# Altium PCB LTE GNSS Tracker.PcbDoc (part 2 of 5)
Units mil, origin at the board's own origin, x right, y up, seen from the top; angles counter-clockwise.
Board outline 2165.35 x 4361.93 mil, 4 copper layers (Top Layer, Layer 1, Layer 2, Bottom Layer), stack 38.189 mil thick; 158 components, 113 nets, 617 pads, 1197 vias.
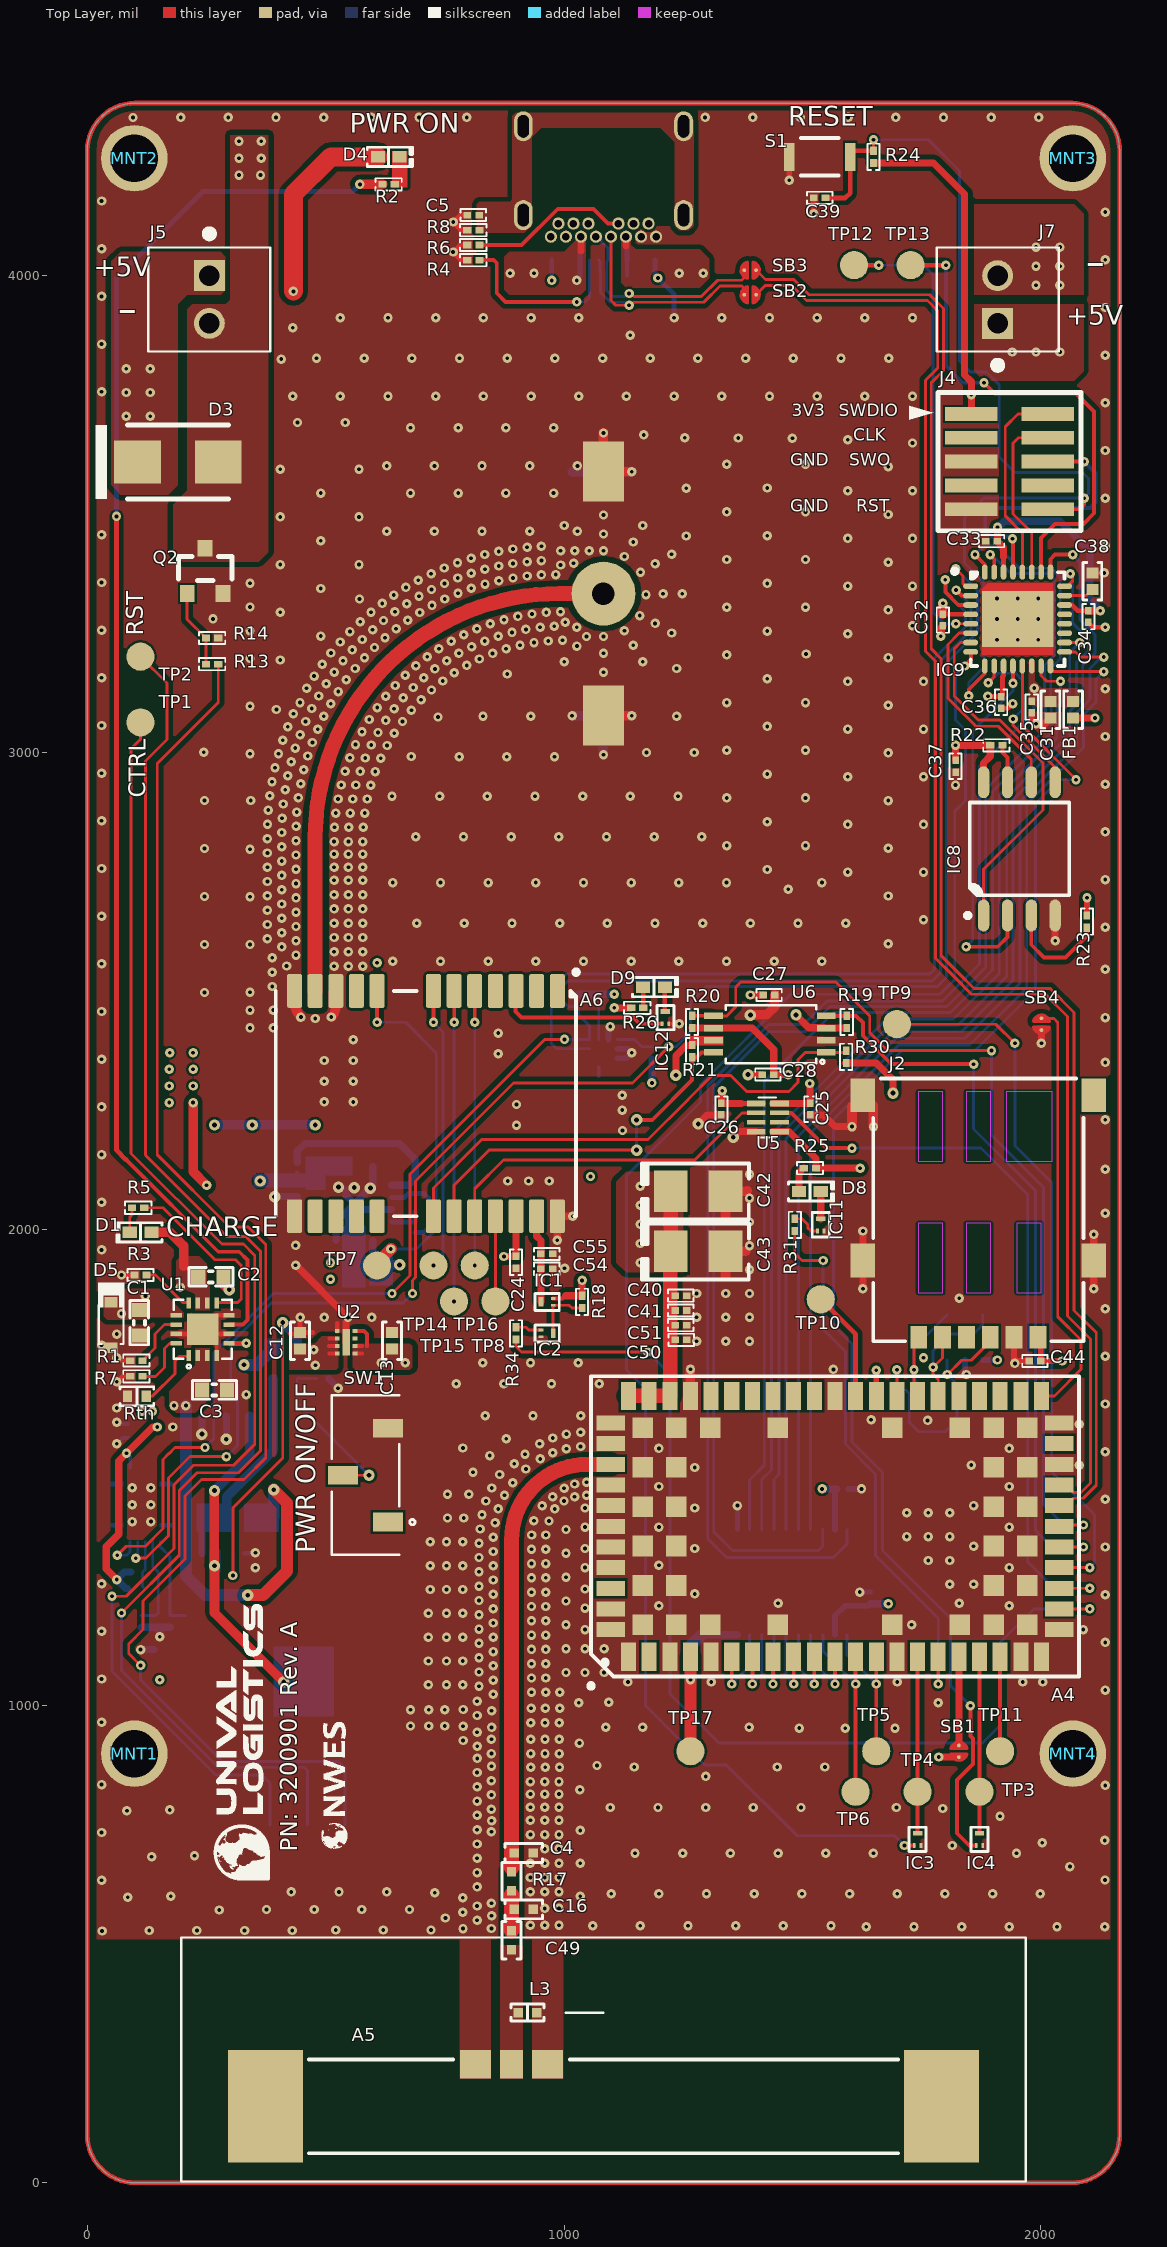
[diagram p0: Top Layer view]

## Part data (continued)
C50: library part Capacitor, "CAP CER 15PF 25V C0G 0201", Device Package="0201 (0603 Metric)", Manufacturer="TDK Corporation", Operating Temperature="-55°C ~ 125°C", Part Number=CGA1A2C0G1E150J030BA, Ratings=AEC-Q200, Supplier Part Number 1=445-9034-1-ND, Temperature Coefficient="C0G, NP0", Tolerance=±5%, Voltage - Rated=25V, Applications=Automotive, Capacitance=15pF, ComponentLink1Description=Datasheet, ComponentLink1URL=https://product.tdk.com/info/en/catalog/datasheets/mlcc_automotive_general_en.pdf?ref_disty=digikey, ComponentLink2Description="DigiKey Link", ComponentLink2URL=http://digikey.com/product-detail/en/tdk-corporation/CGA1A2C0G1E150J030BA/445-9034-1-ND/3648614, LastUpdated="21/01/2020 00:00:11", Lifecycle Status=Active, Minimum Order=1, Mounting Type="Surface Mount, MLCC", Package / Case="0201 (0603 Metric)", Packaging=TapeAndReel, Part Status=Active, PartId=1675, Price=0.01, Series=CGA, Size / Dimension="0.024\" L x 0.012\" W (0.60mm x 0.30mm)", Supplier 1=DigiKey, Thickness (Max)="0.013\" (0.33mm)"
D1 D9: library part LED, "LED RED CLEAR 0402 SMD", Current - Test=20mA, Device Package="0402 (1005 Metric)", Lens Color=Clear, Manufacturer=Inolux, Millicandela Rating=90mcd, Part Number=IN-S42ATR, Supplier Device Package=0402, Supplier Part Number 1=1830-1057-1-ND, Voltage - Forward (Vf) (Typ)=2.1V, Color=Red, ComponentLink1Description=Datasheet, ComponentLink1URL=http://www.inolux-corp.com/datasheet/SMDLED/Mono%20Color%20Top%20View/IN-S42AT%20Series_V1.1.pdf, ComponentLink2Description="DigiKey Link", ComponentLink2URL=http://digikey.com/product-detail/en/inolux/IN-S42ATR/1830-1057-1-ND/7604692, Configuration=Standard, Height (Max)=0.55mm, LastUpdated="21/01/2020 03:12:45", Lens Size="0.60mm x 0.45mm", Lens Style="Rectangle with Flat Top", Lens Transparency=Clear, Lifecycle Status=Active, Minimum Order=1, Mounting Type="Surface Mount", Package / Case="0402 (1005 Metric)", Packaging=TapeAndReel, Part Status=Active, PartId=504, Price=0.06, Series=IN-S42AT, Size / Dimension="1.00mm L x 0.50mm W", Supplier 1=DigiKey, Viewing Angle=130°, Wavelength - Dominant=631nm, Wavelength - Peak=645nm
D2: "Diode Small Signal Schottky 30V 0.2A Automotive 4-Pin UMD T/R", Average Rectified Current=200mA, Case/Package=SOT-343, Forward Voltage=500mV, Manufacturer=Rohm, Max Forward Surge Current (Ifsm)=1A, Max Operating Temperature=125°C, Max Repetitive Reverse Voltage (Vrrm)=30V, Max Reverse Current=30uA, Package Quantity=1, Supplier Part Number 1=846-RB481KTLCT-ND, Category="Schottky Diodes", ComponentLink1Description=https://datasheet.ciiva.com/906/rb481k-906368.pdf?src-supplier=Digi-Key, ComponentLink1URL=https://datasheet.ciiva.com/906/rb481k-906368.pdf?src-supplier=Digi-Key, ComponentLink2Description=https://datasheet.ciiva.com/5739/24652-5739061.pdf?src-supplier=Farnell, ComponentLink2URL=https://datasheet.ciiva.com/5739/24652-5739061.pdf?src-supplier=Farnell, ComponentLink3Description=https://datasheet.ciiva.com/25968/rb481k-25968757.pdf?src-supplier=Avnet+Europe, ComponentLink3URL=https://datasheet.ciiva.com/25968/rb481k-25968757.pdf?src-supplier=Avnet+Europe, ComponentLink4Description=https://datasheet.ciiva.com/13083/rb481k-210787-13083722.pdf?src-supplier=Mouser, ComponentLink4URL=https://datasheet.ciiva.com/13083/rb481k-210787-13083722.pdf?src-supplier=Mouser, ComponentLink5Description=https://datasheet.ciiva.com/26325/140681-da-01-en-schottky-diode-rb481ktl-sot-343-26325256.pdf?src-supplier=Conrad, ComponentLink5URL=https://datasheet.ciiva.com/26325/140681-da-01-en-schottky-diode-rb481ktl-sot-343-26325256.pdf?src-supplier=Conrad, ComponentLink6Description=https://datasheet.ciiva.com/16481/rb481k-16481067.pdf?src-supplier=Future+Electronics, ComponentLink6URL=https://datasheet.ciiva.com/16481/rb481k-16481067.pdf?src-supplier=Future+Electronics, Current Rating=200mA, Forward Current=200mA, Height=0.9mm, Lead Free="Lead Free", Length=2mm, Manufacturer Part Number=RB481KTL, Max Reverse Leakage Current=30uA, Max Reverse Voltage (DC)=30V, Max Surge Current=1A, Mount="Surface Mount", Number of Pins=4, Packaging="Tape and Reel", Peak Non-Repetitive Surge Current=1A, Pricing 1="1=0.51000, 10=0.43300, 100=0.32340 (USD)", Radiation Hardening=No, REACH SVHC="No SVHC", RoHS=Yes, RoHS Compliant=Yes, Series=-, Stock 1=154, Supplier 1=Digi-Key, Termination=SMD/SMT, Voltage Rating (DC)=30V, Width=1.25mm
D3: library part 1N5819HW1-7-F, "DIODE GEN PURP 50V 3A SMB", Digi-Key Part Number=ES3AB-FDITR-ND, Manufacturer="Diodes Incorporated", Part Number=ES3AB-13-F, Supplier=Digi-Key, Vendor=Comchip
D4 D8: library part LED, "LED GREEN CLEAR 0402 SMD", Current - Test=20mA, Device Package="0402 (1005 Metric)", Lens Color=Colorless, Manufacturer="QT Brightek (QTB)", Millicandela Rating=600mcd, Part Number=QBLP595-IG, Supplier Device Package=0402, Supplier Part Number 1=1516-1216-1-ND, Voltage - Forward (Vf) (Typ)=3.1V, Color=Green, ComponentLink1Description=Datasheet, ComponentLink1URL="http://www.qt-brightek.com/datasheet/QBLP595 Series.pdf", ComponentLink2Description="DigiKey Link", ComponentLink2URL=http://digikey.com/product-detail/en/qt-brightek-qtb/QBLP595-IG/1516-1216-1-ND/6201913, Configuration=Standard, Height (Max)=0.60mm, LastUpdated="21/01/2020 03:11:39", Lens Size="0.70mm x 0.50mm", Lens Style="Rectangle with Flat Top", Lens Transparency=Clear, Lifecycle Status=Active, Minimum Order=1, Mounting Type="Surface Mount", Package / Case="0402 (1005 Metric)", Packaging=TapeAndReel, Part Status=Active, PartId=717, Price=0.08, Series=QBLP595, Size / Dimension="1.00mm L x 0.50mm W", Supplier 1=DigiKey, Viewing Angle=140°, Wavelength - Dominant=520nm
D5: "Zener Diode 6.2V 0.2W SOD-323", Manufacturer="Yangjie Electronic Technology", Supplier Part Number 1=3191-BZT52C6V2S-F2-0000HFCT-ND, Category="Zener Diodes", Manufacturer Part Number=BZT52C6V2S-F2-0000HF, Pricing 1="1=0.22000, 10=0.17700, 100=0.09400, 500=0.06188, 1000=0.04208 (USD)", RoHS=No, Stock 1=2869, Supplier 1=Digi-Key
D7: library part "DIODES SOT-23-6", "TVS DIODE 5V 9V SOT26", Current - Peak Pulse (10/1000µs)="6A (8/20µs)", Device Package=SOT-23-6, Manufacturer="Diodes Incorporated", Operating Temperature="-55°C ~ 85°C (TA)", Power - Peak Pulse=55W, Power Line Protection=Yes, Supplier Device Package=SOT-26, Supplier Part Number 1=DT1042-04SO-7DICT-ND, Voltage - Breakdown (Min)=6.2V, Voltage - Clamping (Max) @ Ipp=9V, Voltage - Reverse Standoff (Typ)="5V (Max)", Applications=HDMI, ComponentLink1Description=Datasheet, ComponentLink1URL=https://www.diodes.com/assets/Datasheets/DT1042-04SO.pdf, ComponentLink2Description="DigiKey Link", ComponentLink2URL=http://digikey.com/product-detail/en/diodes-incorporated/DT1042-04SO-7/DT1042-04SO-7DICT-ND/4457893, LastUpdated="30/03/2020 16:25:53", Lifecycle Status=Active, Minimum Order=1, Mounting Type="Surface Mount", Package / Case=SOT-23-6, Packaging=TapeAndReel, Part Number=DT1042-04SO-7, Part Status=Active, PartId=10505, Price=0.08, Series=-, Supplier 1=DigiKey, Type="Steering (Rail to Rail)", Unidirectional Channels=4
FB1: library part "Ferrite Chip", "FERRITE BEAD 600 OHM 0402 1LN", Current Rating (Max)=900mA, DC Resistance (DCR) (Max)=230mOhm, Device Package="0402 (1005 Metric)", Manufacturer="Murata Electronics", Operating Temperature="-55°C ~ 125°C", Part Number=BLM15PX601SZ1D, Ratings=AEC-Q200, Supplier Part Number 1=490-16655-1-ND, ComponentLink1Description=Datasheet, ComponentLink1URL=https://www.murata.com/en-us/products/productdata/8796748677150/QNFA9118.pdf, ComponentLink2Description="DigiKey Link", ComponentLink2URL=http://digikey.com/product-detail/en/murata-electronics/BLM15PX601SZ1D/490-16655-1-ND/7595577, Filter Type="Power Line", Height (Max)="0.022\" (0.55mm)", Impedance @ Frequency="600 Ohms @ 100MHz", LastUpdated="21/01/2020 02:26:14", Lifecycle Status=Active, Minimum Order=1, Mounting Type="Surface Mount", Number of Lines=1, Package / Case="0402 (1005 Metric)", Packaging=TapeAndReel, Part Status=Active, PartId=191, Price=0.03, Series=BLM, Size / Dimension="0.039\" L x 0.022\" W (1.00mm x 0.55mm)", Supplier 1=DigiKey
FB5: library part "Ferrite Chip", "FERRITE BEAD 240 OHM 0201 1LN", Current Rating (Max)=400mA, DC Resistance (DCR) (Max)=320mOhm, Device Package="0201 (0603 Metric)", Manufacturer="Taiyo Yuden", Operating Temperature="-55°C ~ 125°C", Part Number=BK0603TS241-T, Supplier Part Number 1=587-3276-1-ND, ComponentLink1Description=Datasheet, ComponentLink1URL="https://ds.yuden.co.jp/TYCOMPAS/ut/detail?pn=BK0603TS241-T  &u=M", ComponentLink2Description="DigiKey Link", ComponentLink2URL=http://digikey.com/product-detail/en/taiyo-yuden/BK0603TS241-T/587-3276-1-ND/4157923, Height (Max)="0.013\" (0.33mm)", Impedance @ Frequency="240 Ohms @ 100MHz", LastUpdated="21/01/2020 02:24:59", Lifecycle Status=Active, Minimum Order=1, Mounting Type="Surface Mount", Number of Lines=1, Package / Case="0201 (0603 Metric)", Packaging=TapeAndReel, Part Status=Active, PartId=40, Price=0.03, Series=BK, Size / Dimension="0.024\" L x 0.012\" W (0.60mm x 0.30mm)", Supplier 1=DigiKey
IC1: library part "TI CSD MOSFET P-CH", "MOSFET P-CH 12V 2.3A 3PICOSTAR", Current - Continuous Drain (Id) @ 25°C="2.3A (Ta)", Device Package=3-XFDFN, Drain to Source Voltage (Vdss)=12V, Drive Voltage (Max Rds On,  Min Rds On)="1.8V, 4.5V", Power Dissipation (Max)="500mW (Ta)", Supplier Device Package=3-PICOSTAR, Supplier Part Number 1=296-40002-2-ND, ComponentLink1Description=Datasheet, ComponentLink1URL=http://www.ti.com/general/docs/suppproductinfo.tsp?distId=10&gotoUrl=http%3A%2F%2Fwww.ti.com%2Flit%2Fgpn%2Fcsd13381f4, ComponentLink2Description="DigiKey Link", ComponentLink2URL=http://digikey.com/product-detail/en/texas-instruments/CSD13381F4/296-38912-1-ND/5143018, FET Type=P-Channel, Package / Case=3-XFDFN, Packaging=TapeAndReel, Part Number=CSD23381F4, Part Status=Active, Price=0.07, Rds On (Max) @ Id, Vgs="180mOhm @ 500mA, 4.5V", Series=NexFET™, Supplier 1=DigiKey, Technology="MOSFET (Metal Oxide)", Vgs (Max)=-8V, Vgs(th) (Max) @ Id="1.2V @ 250µA"
IC2 IC3 IC4 IC11 IC12: library part "TI CSD MOSFET N-CH F4", "MOSFET N-CH 12V 2.1A 3PICOSTAR", Current - Continuous Drain (Id) @ 25°C="2.1A (Ta)", Device Package=3-XFDFN, Drain to Source Voltage (Vdss)=12V, Drive Voltage (Max Rds On,  Min Rds On)="1.8V, 4.5V", Input Capacitance (Ciss) (Max) @ Vds="200pF @ 6V", Manufacturer="Texas Instruments", Operating Temperature="-55°C ~ 150°C (TJ)", Power Dissipation (Max)="500mW (Ta)", Supplier Device Package=3-PICOSTAR, Supplier Part Number 1=296-38912-1-ND, ComponentLink1Description=Datasheet, ComponentLink1URL=http://www.ti.com/general/docs/suppproductinfo.tsp?distId=10&gotoUrl=http%3A%2F%2Fwww.ti.com%2Flit%2Fgpn%2Fcsd13381f4, ComponentLink2Description="DigiKey Link", ComponentLink2URL=http://digikey.com/product-detail/en/texas-instruments/CSD13381F4/296-38912-1-ND/5143018, FET Type=N-Channel, Gate Charge (Qg) (Max) @ Vgs="1.4nC @ 4.5V", LastUpdated="30/03/2020 15:00:54", Lifecycle Status=Active, Minimum Order=1, Mounting Type="Surface Mount", Package / Case=3-XFDFN, Packaging=TapeAndReel, Part Number=CSD13381F4, Part Status=Active, Price=0.07, Rds On (Max) @ Id, Vgs="180mOhm @ 500mA, 4.5V", Series=NexFET™, Supplier 1=DigiKey, Technology="MOSFET (Metal Oxide)", Vgs (Max)=8V, Vgs(th) (Max) @ Id="1.1V @ 250µA"
IC8: library part "WINBOND FLASH SPI 8PIN", "IC FLASH 32M SPI 133MHZ 8SOIC", Clock Frequency=133MHz, Device Package="8-SOIC (0.209\", 5.30mm Width)", Manufacturer="Winbond Electronics", Operating Temperature="-40°C ~ 85°C (TA)", Supplier Device Package=8-SOIC, Supplier Part Number 1=W25Q32JVSSIQCT-ND, Voltage - Supply="2.7V ~ 3.6V", ComponentLink1Description=Datasheet, ComponentLink1URL=http://www.winbond.com/resource-files/w25q32jv%20revg%2003272018%20plus.pdf, ComponentLink2Description="DigiKey Link", ComponentLink2URL=http://digikey.com/product-detail/en/winbond-electronics/W25Q32JVSSIQ-TR/W25Q32JVSSIQCT-ND/7393546, LastUpdated="30/03/2020 15:35:36", Lifecycle Status=Active, Memory Format=FLASH, Memory Interface="SPI - Quad I/O", Memory Size="32Mb (4M x 8)", Memory Type=Non-Volatile, Minimum Order=1, Mounting Type="Surface Mount", Package / Case="8-SOIC (0.209\", 5.30mm Width)", Packaging=TapeAndReel, Part Number="W25Q32JVSSIQ TR", Part Status=Active, PartId=857, Price=0.54, Series=SpiFlash®, Supplier 1=DigiKey, Technology="FLASH - NOR", Write Cycle Time - Word, Page=3ms
IC9: library part "SI LABS EFM32TG11B5", "LOW PWR MCU CORTEX-M0+ QFN32 128", Device Package="32-WFQFN Exposed Pad", Manufacturer="Silicon Labs", Operating Temperature="-40°C ~ 85°C (TA)", Supplier Device Package="32-QFN (5x5)", Supplier Part Number 1=336-5690-ND, Voltage - Supply (Vcc/Vdd)="1.8V ~ 3.8V", ComponentLink1Description=Datasheet, ComponentLink1URL=https://www.silabs.com/documents/public/data-sheets/efm32tg11-datasheet.pdf, ComponentLink2Description="DigiKey Link", ComponentLink2URL=http://digikey.com/product-detail/en/silicon-labs/EFM32TG11B520F128GM32-B/336-5690-ND/9677682, Connectivity="CANbus, I²C, IrDA, LINbus, SmartCard, SPI, UART/USART", Core Processor="ARM® Cortex®-M0+", Core Size=32-Bit, Data Converters="A/D 12bit SAR; D/A 12bit", LastUpdated="30/03/2020 15:34:59", Lifecycle Status=Active, Minimum Order=1, Mounting Type="Surface Mount", Number of I/O=22, Oscillator Type=Internal, Package / Case="32-WFQFN Exposed Pad", Packaging=Tray, Part Number=EFM32TG11B520F128GM32-B, Part Status=Active, PartId=197, Peripherals="Brown-out Detect/Reset, DMA, I²S, POR, PWM, WDT", Price=2.06, Program Memory Size="128KB (128K x 8)", Program Memory Type=FLASH, RAM Size="32K x 8", Series="Tiny Gecko 1", Speed=48MHz, Supplier 1=DigiKey
IC10: library part "TI TXB0108PWR", "IC TRNSLTR BIDIRECTIONAL 20TSSOP", Device Package="20-TSSOP (0.173\", 4.40mm Width)", Manufacturer="Texas Instruments", Operating Temperature="-40°C ~ 85°C (TA)", Supplier Device Package=20-TSSOP, Supplier Part Number 1=296-21527-1-ND, Voltage - VCCA="1.2V ~ 3.6V", Voltage - VCCB="1.65V ~ 5.5V", Channel Type=Bidirectional, Channels per Circuit=8, ComponentLink1Description=Datasheet, ComponentLink1URL=http://www.ti.com/general/docs/suppproductinfo.tsp?distId=10&gotoUrl=http%3A%2F%2Fwww.ti.com%2Flit%2Fgpn%2Ftxb0108, ComponentLink2Description="DigiKey Link", ComponentLink2URL=http://digikey.com/product-detail/en/texas-instruments/TXB0108PWR/296-21527-1-ND/1305700, Data Rate=100Mbps, Features="Auto-Direction Sensing", LastUpdated="30/03/2020 16:25:06", Lifecycle Status=Active, Minimum Order=1, Mounting Type="Surface Mount", Number of Circuits=1, Output Type="Tri-State, Non-Inverted", Package / Case="20-TSSOP (0.173\", 4.40mm Width)", Packaging=TapeAndReel, Part Number=TXB0108PWR, Part Status=Active, Price=0.69, Series=-, Supplier 1=DigiKey, Translator Type="Voltage Level"
IC13: library part "ST LIS2DH12TR", "ACCEL 2-16G I2C/SPI 12LGA", Device Package=12-VFLGA, Manufacturer=STMicroelectronics, Operating Temperature="-40°C ~ 85°C (TA)", Supplier Device Package="12-LGA (2x2)", Supplier Part Number 1=497-14851-1-ND, Voltage - Supply="1.71V ~ 3.6V", Acceleration Range="±2g, 4g, 8g, 16g", Axis="X, Y, Z", Bandwidth="0.5Hz ~ 672Hz", ComponentLink1Description=Datasheet, ComponentLink1URL=http://www.st.com/content/ccc/resource/technical/document/datasheet/12/c0/5c/36/b9/58/46/f2/DM00091513.pdf/files/DM00091513.pdf/jcr:content/translations/en.DM00091513.pdf, ComponentLink2Description="DigiKey Link", ComponentLink2URL=http://digikey.com/product-detail/en/stmicroelectronics/LIS2DH12TR/497-14851-1-ND/4899838, Features="Adjustable Bandwidth, Selectable Scale, Sleep Mode, Temperature Sensor", LastUpdated="30/03/2020 15:41:11", Lifecycle Status=Active, Minimum Order=1, Mounting Type="Surface Mount", Output Type="I²C, SPI", Package / Case=12-VFLGA, Packaging=TapeAndReel, Part Number=LIS2DH12TR, Part Status=Active, Price=0.60, Sensitivity (LSB/g)="1000 (±2g) ~ 83 (±16g)", Series=-, Supplier 1=DigiKey, Type=Digital
J1: "CONN RCP USB3.1 TYPEC 24P SMD RA", Manufacturer="Würth Elektronik", Supplier Part Number 1=732-9617-2-ND, Part Number=632723100011, Supplier 1=Digi-Key
J2: library part "GCT SIM8060-6-1-14-00-A", "CONN SIM NANO HINGED 6P W/SWITCH", Manufacturer=GCT, Supplier Part Number 1=2073-SIM8060-6-1-14-00-ACT-ND, Card Type="NANO SIM", ComponentLink1Description=Datasheet, ComponentLink1URL=https://gct.co/files/drawings/sim8060.pdf, ComponentLink2Description="DigiKey Link", ComponentLink2URL=http://digikey.com/product-detail/en/gct/SIM8060-6-1-14-00-A/2073-SIM8060-6-1-14-00-ACT-ND/10127236, Connector Type="Connector and Ejector", Contact Finish=Gold, Contact Finish Thickness="1.00µin (0.025µm)", Height Above Board="0.056\" (1.42mm)", Insertion, Removal Method="Hinged Lid", LastUpdated="30/03/2020 15:26:01", Lifecycle Status=Active, Minimum Order=1, Mounting Feature="Normal, Standard - Top", Mounting Type="Surface Mount, Right Angle", Number of Positions=6, Packaging=TapeAndReel, Part Number=SIM8060-6-1-14-00-A, Part Status=Active, Price=0.70, Series=SIM8060, Supplier 1=DigiKey
J3: library part CON2, "CONN HEADER SMD R/A 2POS 2MM", Supplier Part Number 1=455-1749-2-ND, Package=S2B-PH-SM4-TB(LF)(SN), Part Number=S2B-PH-SM4-TB(LF)(SN), Price Estim. @ 100pcs=0.5419, Supplier 1=Digi-Key
J4: "CONN HEADER SMD 10POS 1.27MM", Manufacturer="Samtec Inc.", Part Number=FTSH-105-01-L-DV-K-TR, Supplier Part Number 1=SAM13165TR-ND, Supplier 1=Digi-Key
J5 J7: library part "Header 2", "TERM BLK 2P SIDE ENT 2.54MM PCB", Manufacturer="TE Connectivity", Part Number=282834-2, Supplier Part Number 1=A98333-ND, Supplier 1=Digi-Key
J6: library part "Header 6", "CONN HEADER SMD 6POS 2MM", Manufacturer=JST, Part Number=B6B-PH-SM4-TB(LF)(SN), Supplier Part Number 1=455-1738-2-ND, Supplier 1=Digi-Key
L1: library part NRS8030T2R2NJGJ, "Inductor Power Shielded Wirewound 2.2uH 30% 100KHz Ferrite 4.8A 0.0195Ohm DCR 3131 T/R", Case/Package=Nonstandard, Current Rating=4.8A, DC Resistance (DCR)=19.5mR, Inductance Tolerance=30%, Manufacturer="Taiyo Yuden", Max DC Current=4.9A, Max Operating Temperature=125°C, Min Operating Temperature=-25°C, Package Quantity=1000, Resistor Type=Wirewound, Self Resonant Frequency=60MHz, Supplier Part Number 1=1077538, Test Frequency=100kHz, Category="Fixed Inductors", ComponentLink1Description=https://datasheet.ciiva.com/8504/nrs8030t2r2njgj-ss-8504418.pdf?src-supplier=Avnet, ComponentLink1URL=https://datasheet.ciiva.com/8504/nrs8030t2r2njgj-ss-8504418.pdf?src-supplier=Avnet, ComponentLink2Description=https://datasheet.ciiva.com/6699/nrs8030t2r2njgj-ss-6699093.pdf?src-supplier=Digi-Key, ComponentLink2URL=https://datasheet.ciiva.com/6699/nrs8030t2r2njgj-ss-6699093.pdf?src-supplier=Digi-Key, ComponentLink3Description=https://datasheet.ciiva.com/25607/0900766b810b3cd2-25607146.pdf?src-supplier=RSComponents, ComponentLink3URL=https://datasheet.ciiva.com/25607/0900766b810b3cd2-25607146.pdf?src-supplier=RSComponents, Core Material=Ferrite, Depth=8.2mm, Halogen Free="Halogen Free", Height=3mm, Height - Seated (Max)=0.118inch, Inductance=2.2uH, Lead Free="Lead Free", Lead Pitch=5.6mm, Length=8mm, Manufacturer Part Number=NRS8030T2R2NJGJ, Mount="Surface Mount", Number of Pins=2, Packaging="Cut Tape", Pricing 1="1000=0.24000, 2000=0.19800, 3000=0.19600, 5000=0.19300, 10000=0.19000 (USD)", Radiation Hardening=No, REACH SVHC=Unknown, RMS Current (Irms)=4.8A, RoHS=Yes, RoHS Compliant=Yes, Saturation Current=4.9A, Series=NRS, Shielding=Shielded, Stock 1=16000, Supplier 1="Future Electronics", Termination=SMD/SMT, Tolerance=30%, Width=8mm
L3: library part Inductor, "FIXED IND 6.8NH 1.45A 68 MOHM", Current Rating (Amps)=1.45A, DC Resistance (DCR)="68mOhm Max", Device Package="0402 (1006 Metric)", Frequency - Self Resonant=7GHz, Inductance Frequency - Test=100MHz, Manufacturer="Murata Electronics", Operating Temperature="-55°C ~ 125°C", Part Number=LQW15AN6N8J8ZD, Q @ Freq="30 @ 250MHz", Ratings=AEC-Q200, Supplier Part Number 1=490-15562-1-ND, Tolerance=±5%, ComponentLink1Description=Datasheet, ComponentLink1URL=https://search.murata.co.jp/Ceramy/image/img/P02/JELF243A-9138.pdf, ComponentLink2Description="DigiKey Link", ComponentLink2URL=http://digikey.com/product-detail/en/murata-electronics/LQW15AN6N8J8ZD/490-15562-1-ND/6800227, Height - Seated (Max)="0.024\" (0.60mm)", Inductance=6.8nH, LastUpdated="21/01/2020 03:29:12", Lifecycle Status=Active, Material - Core=Non-Magnetic, Minimum Order=1, Mounting Type="Surface Mount", Package / Case="0402 (1006 Metric)", Packaging=TapeAndReel, Part Status=Active, PartId=139, Price=0.07, Series=LQW15, Shielding=Unshielded, Size / Dimension="0.039\" L x 0.024\" W (1.00mm x 0.60mm)", Supplier 1=DigiKey, Type=Wirewound
MNT1 MNT2 MNT3 MNT4: library part MNT_1, Emcraft #=NA, Notes=PCB, Part #=NA
Q1: "MOSFET N/P-CH 30V 8.5A/7A 8SO", Case/Package=SOIC, Continuous Drain Current (ID)=8.5A, Drain to Source Resistance=14mR, Drain to Source Voltage (Vdss)=30V, Gate to Source Voltage (Vgs)=20V, Input Capacitance=767pF, Manufacturer=Diodes, Max Operating Temperature=150°C, Max Power Dissipation=2.5W, Min Operating Temperature=-55°C, Package Quantity=2500, Supplier Part Number 1=7514067, Category=MOSFETs, ComponentLink1Description=https://datasheet.ciiva.com/4443/ds32152-88645-4443219.pdf?src-supplier=Mouser, ComponentLink1URL=https://datasheet.ciiva.com/4443/ds32152-88645-4443219.pdf?src-supplier=Mouser, ComponentLink2Description=https://datasheet.ciiva.com/928/ds32152-928775.pdf?src-supplier=Digi-Key, ComponentLink2URL=https://datasheet.ciiva.com/928/ds32152-928775.pdf?src-supplier=Digi-Key, ComponentLink3Description=https://datasheet.ciiva.com/928/ds32152-928776.pdf?src-supplier=Digi-Key, ComponentLink3URL=https://datasheet.ciiva.com/928/ds32152-928776.pdf?src-supplier=Digi-Key, ComponentLink4Description=https://datasheet.ciiva.com/928/ds32152-928777.pdf?src-supplier=Digi-Key, ComponentLink4URL=https://datasheet.ciiva.com/928/ds32152-928777.pdf?src-supplier=Digi-Key, FET Type="N and P-Channel", Height=1.5mm, Length=4.95mm, Manufacturer Part Number=DMC3021LSD-13, Mount="Surface Mount", Number of Channels=2, Number of Elements=2, Number of Pins=8, Packaging="Tape and Reel", Polarity=N-CHANNEL,P-CHANNEL, Power Dissipation=2.5W, Pricing 1="25=0.61700, 125=0.47900, 625=0.39900, 1250=0.32000 (USD)", Radiation Hardening=No, Rds On Max=21mR, REACH SVHC="No SVHC", RoHS=Yes, RoHS Compliant=Yes, Series=-, Stock 1=225, Supplier 1=RSComponents, Turn-Off Delay Time=50.1ns, Weight=0.00261oz, Width=3.95mm
Q2: library part T:FET-N, "MOSFET N-CH 20V 3.4A SOT23", Manufacturer="Diodes Incorporated", Supplier Part Number 1=ZXMN2A14FTR-ND, Manufacturer Part Number=ZXMN2A14FTA, Part Number=ZXMN2A14FTA, Supplier 1=Digi-Key
R1: library part RSMT0626, "RES SMD 46.4K OHM 1% 1/20W 0201", Manufacturer="Panasonic Electronic Components", Part Number=ERJ-1GNF4642C, Supplier Part Number 1=P123027TR-ND, ComponentLink1Description=Datasheet, ComponentLink1URL=https://chn-vm-apps.microchip.com/mchprepo/parts/Datasheets/AOA0000CE2.pdf, Supplier 1=Digi-Key
R2 R5: library part RSMT0626, "RES SMD 1.5K OHM 1% 1/20W 0201", Manufacturer=Yageo, Part Number=RC0201FR-071K5L, Supplier Part Number 1=YAG2274TR-ND, ComponentLink1Description=Datasheet, ComponentLink1URL=https://chn-vm-apps.microchip.com/mchprepo/parts/Datasheets/AOA0000CE2.pdf, Supplier 1=Digi-Key
R3: library part RSMT0626, "RES SMD 1.18K OHM 1% 1/20W 0201", Manufacturer=Yageo, Part Number=RC0201FR-071K18L, Supplier Part Number 1=YAG2473TR-ND, ComponentLink1Description=Datasheet, ComponentLink1URL=https://chn-vm-apps.microchip.com/mchprepo/parts/Datasheets/AOA0000CE2.pdf, Supplier 1=Digi-Key
R4 R6: library part Resistor, "RES SMD 5.1K OHM 1% 1/20W 0201", Device Package="0201 (0603 Metric)", Manufacturer=Yageo, Operating Temperature="-55°C ~ 125°C", Part Number=AC0201FR-075K1L, Power (Watts)="0.05W, 1/20W", Ratings=AEC-Q200, Supplier Device Package=0201, Supplier Part Number 1=YAG5228TR-ND, Temperature Coefficient=±200ppm/°C, Tolerance=±1%, ComponentLink1Description=Datasheet, ComponentLink1URL=https://industrial.panasonic.com/cdbs/www-data/pdf/RDA0000/AOA0000C304.pdf, ComponentLink2Description="DigiKey Link", ComponentLink2URL=http://digikey.com/product-detail/en/panasonic-electronic-components/ERJ-1GNF1002C/P122414CT-ND/7389440, Composition="Thick Film", Features="Automotive AEC-Q200", Height - Seated (Max)="0.010\" (0.26mm)", LastUpdated="21/01/2020 00:04:13", Lifecycle Status=Active, Minimum Order=1, Number of Terminations=2, Package / Case="0201 (0603 Metric)", Packaging=TapeAndReel, Part Status=Active, PartId=2296, Price=0.01, Resistance="5.1 kOhms", Series=ERJ, Size / Dimension="0.024\" L x 0.012\" W (0.60mm x 0.30mm)", Supplier 1=Digi-Key
R7: library part RSMT0626, "RES SMD 1.13K OHM 1% 1/20W 0201", Manufacturer=Yageo, Part Number=RC0201FR-071K13L, Supplier Part Number 1=YAG2471TR-ND, ComponentLink1Description=Datasheet, ComponentLink1URL=https://chn-vm-apps.microchip.com/mchprepo/parts/Datasheets/AOA0000CE2.pdf, Supplier 1=Digi-Key